# Altium PCB MainBoard_2023_Ver1.PcbDoc (part 1 of 2)
Units mm, origin at the board's own origin, x right, y up, seen from the top; angles counter-clockwise.
Board outline 120.9 x 134.75 mm, 2 copper layers (Top Layer, Bottom Layer); 81 components, 152 nets, 439 pads, 108 vias.
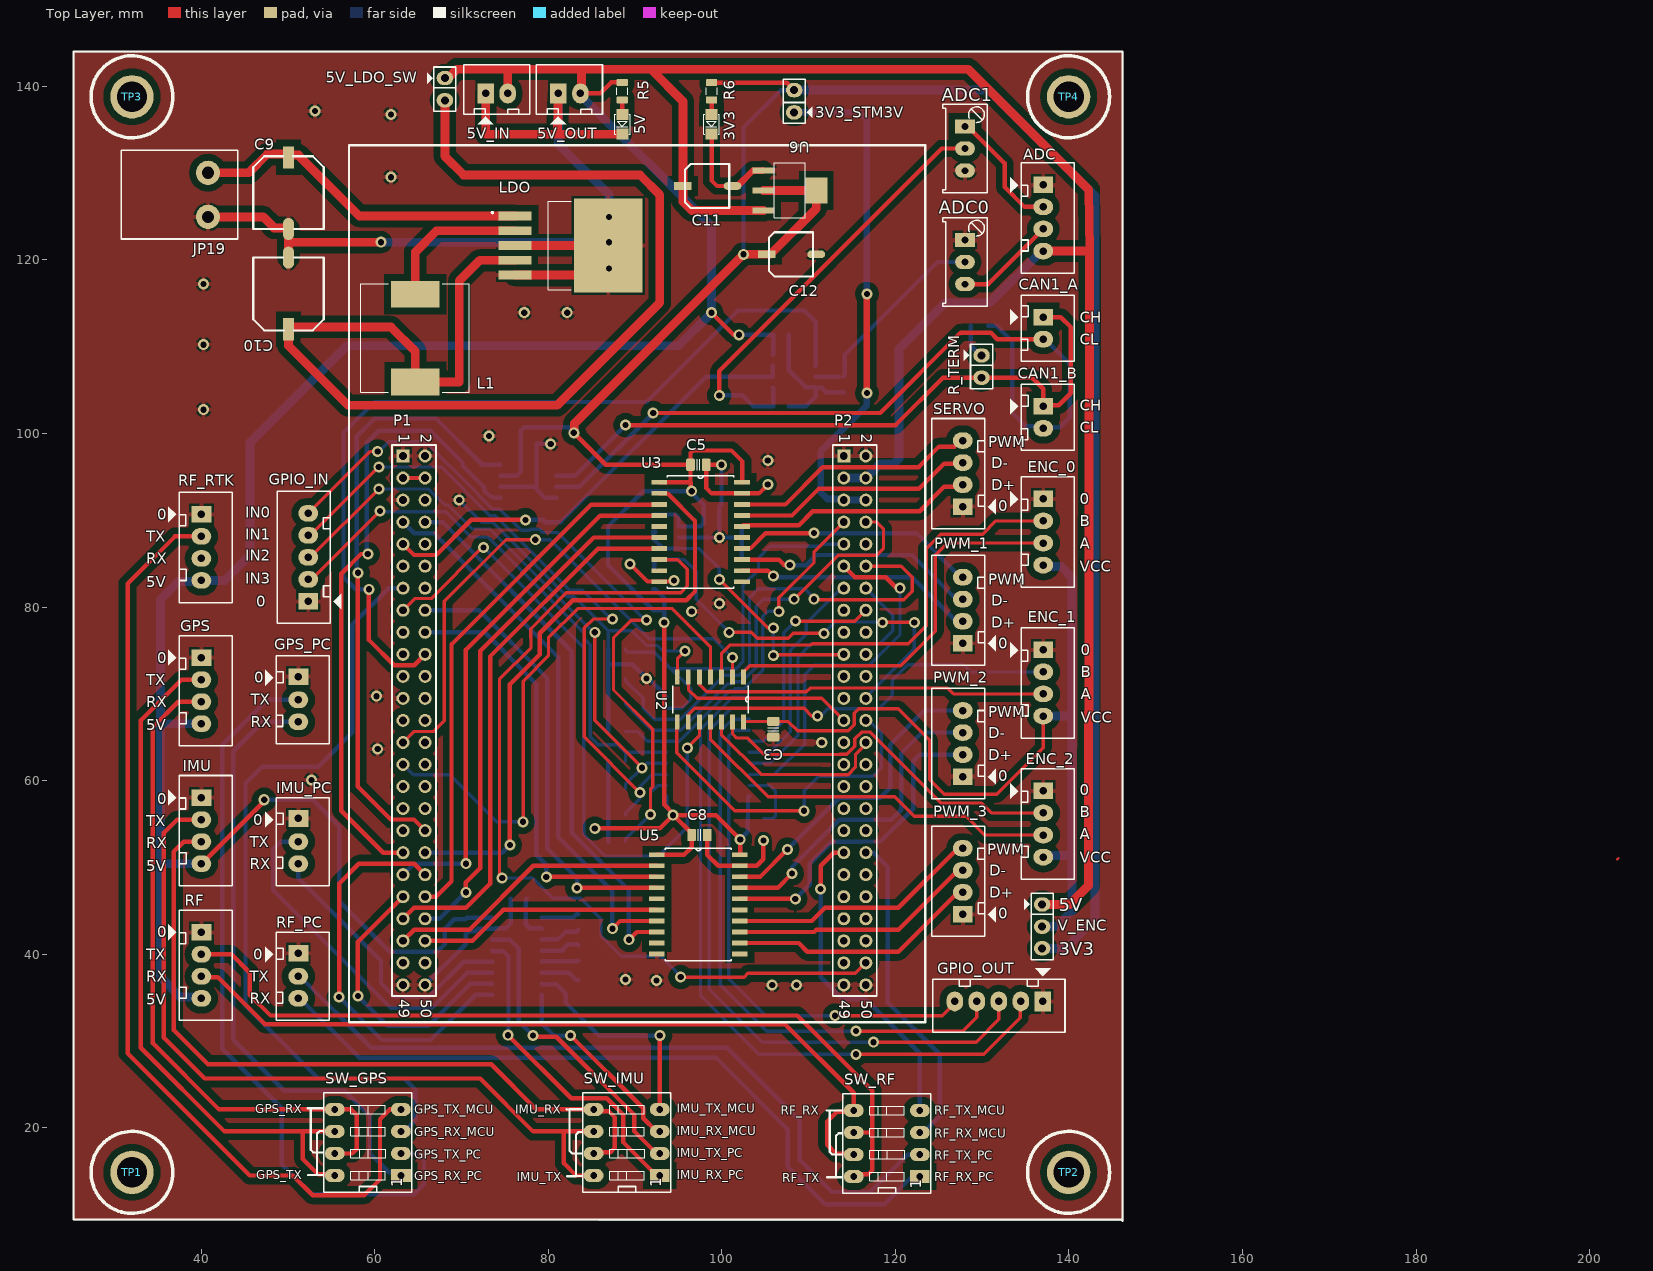
[diagram p0: Top Layer view]
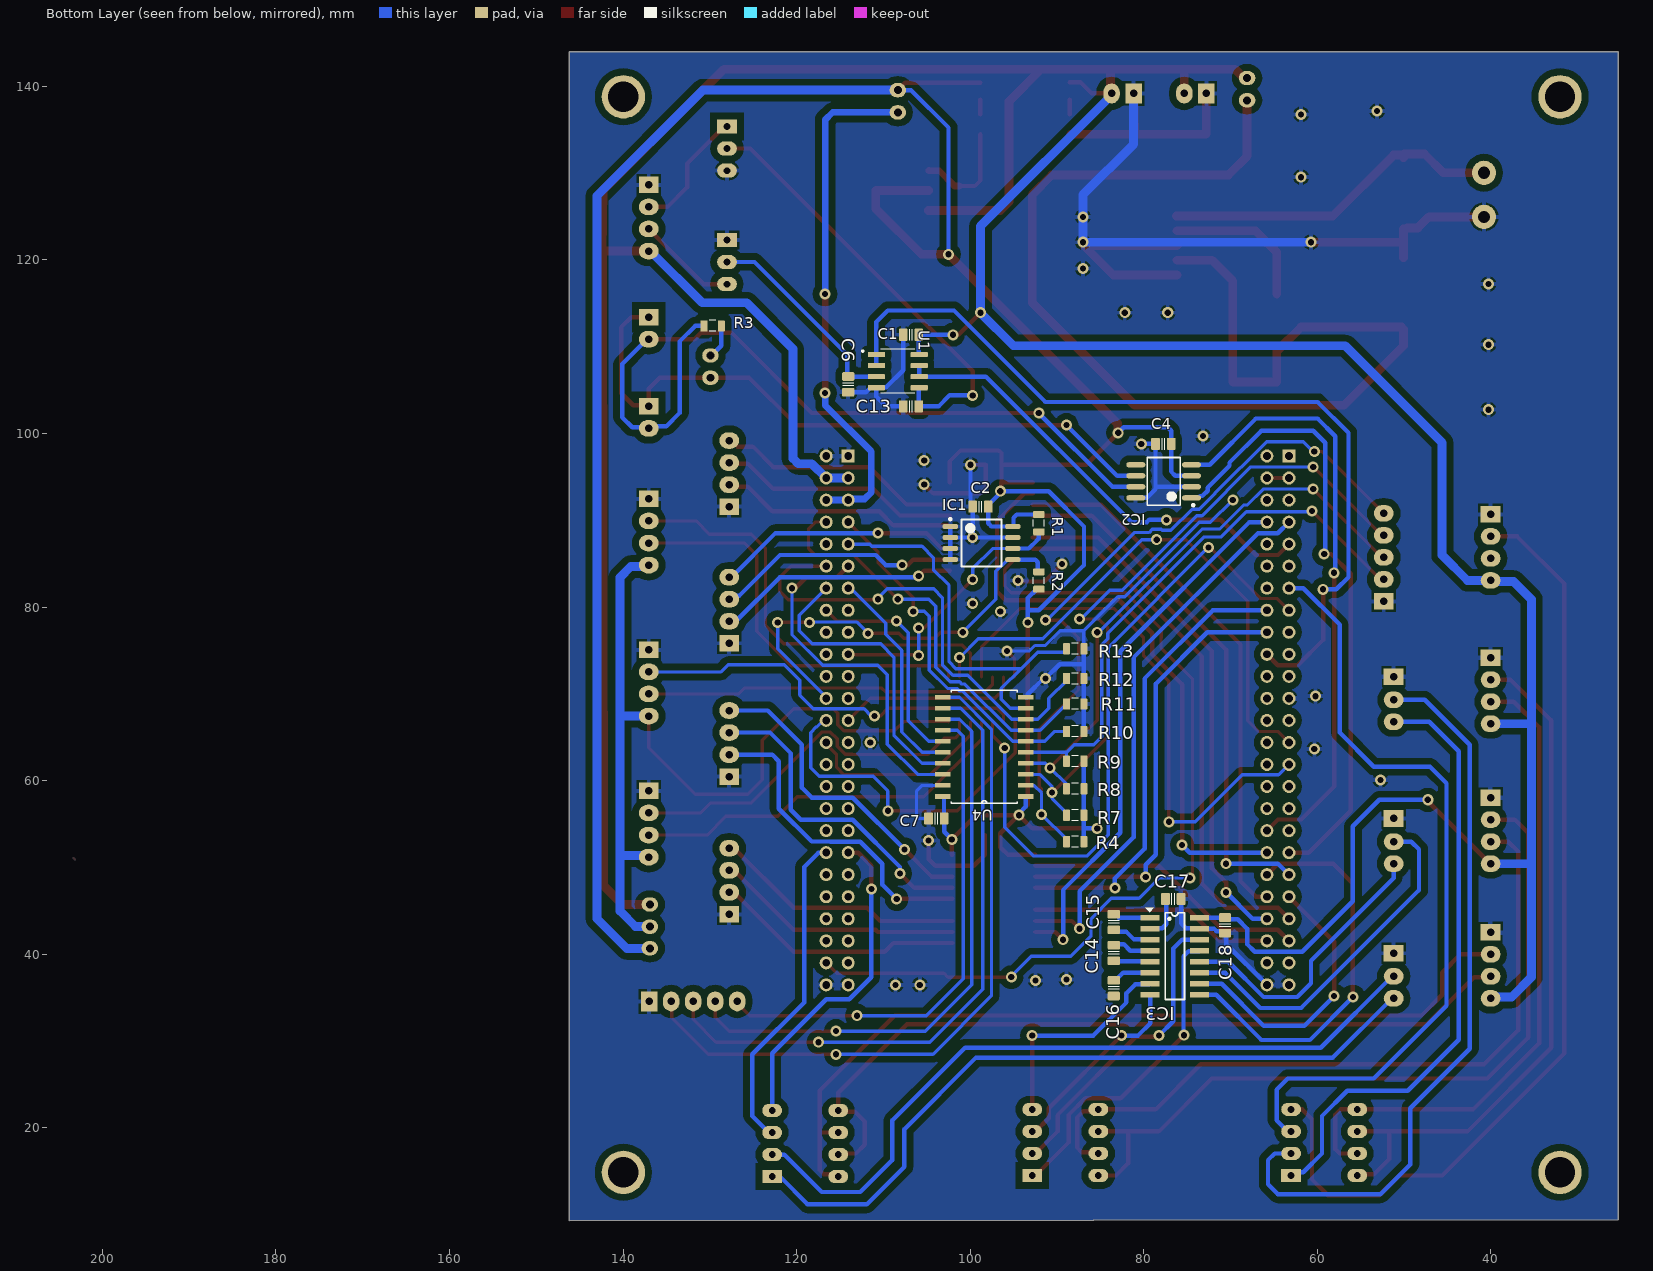
[diagram p1: Bottom Layer view, seen from below]
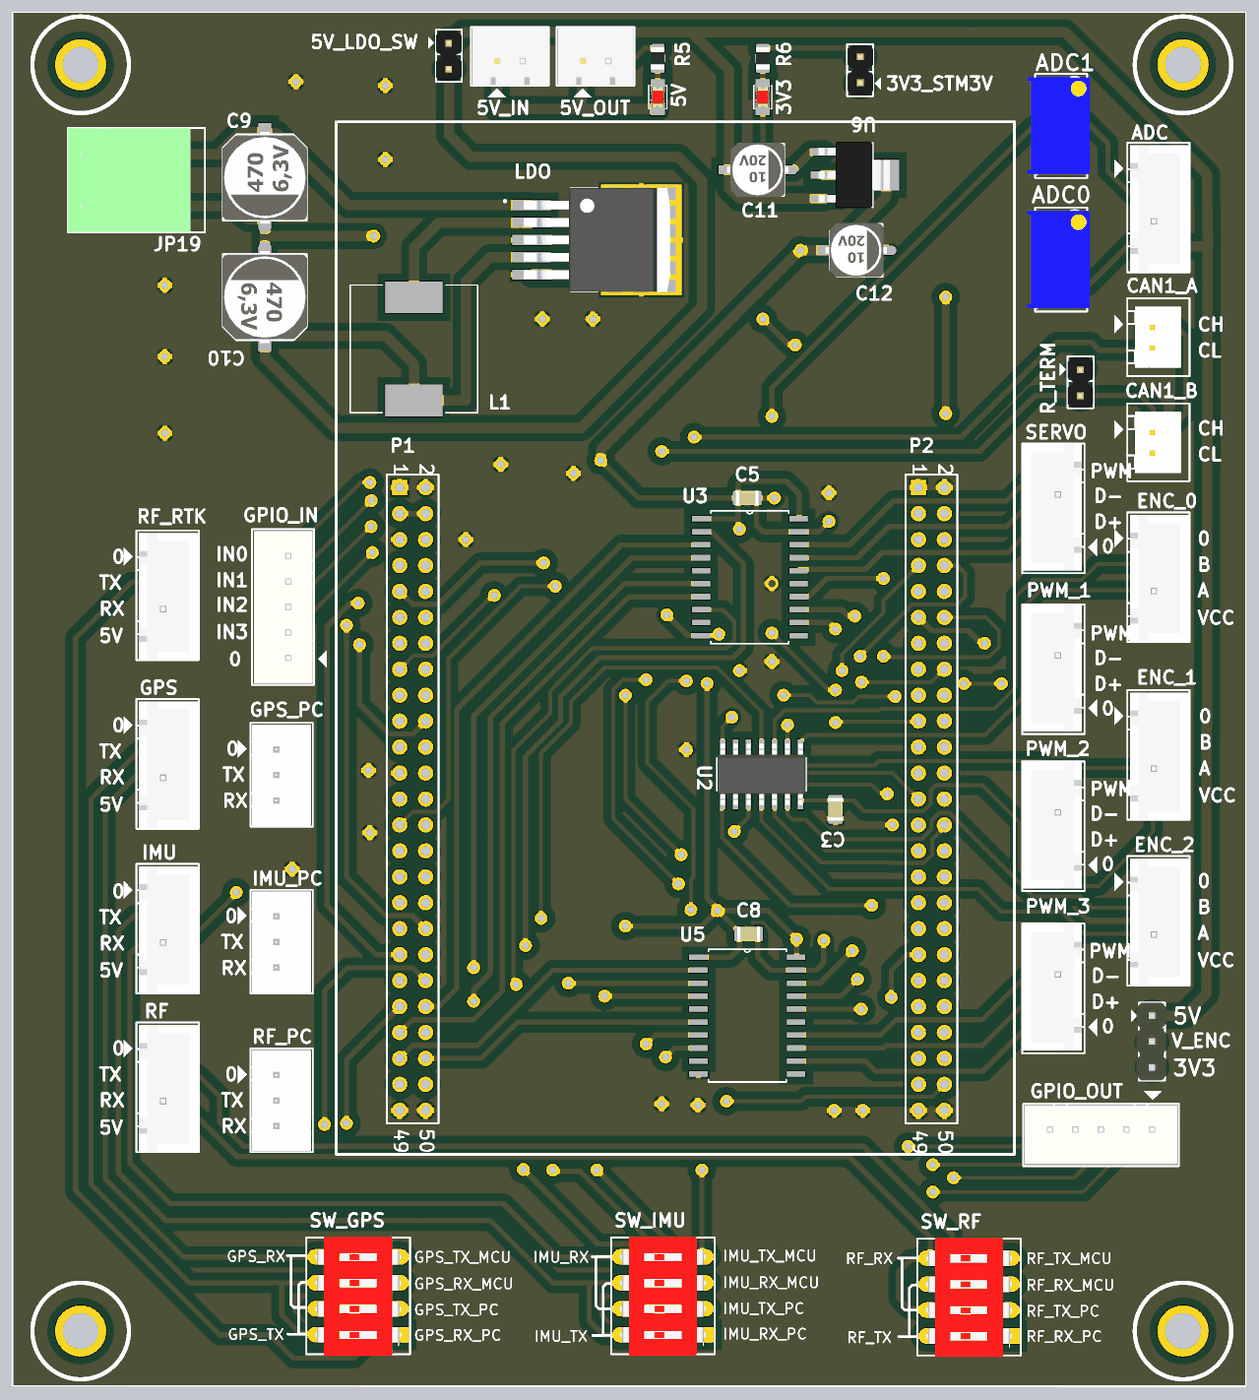
[diagram p3: 3D render of the assembled board from above, using the file's embedded part models]
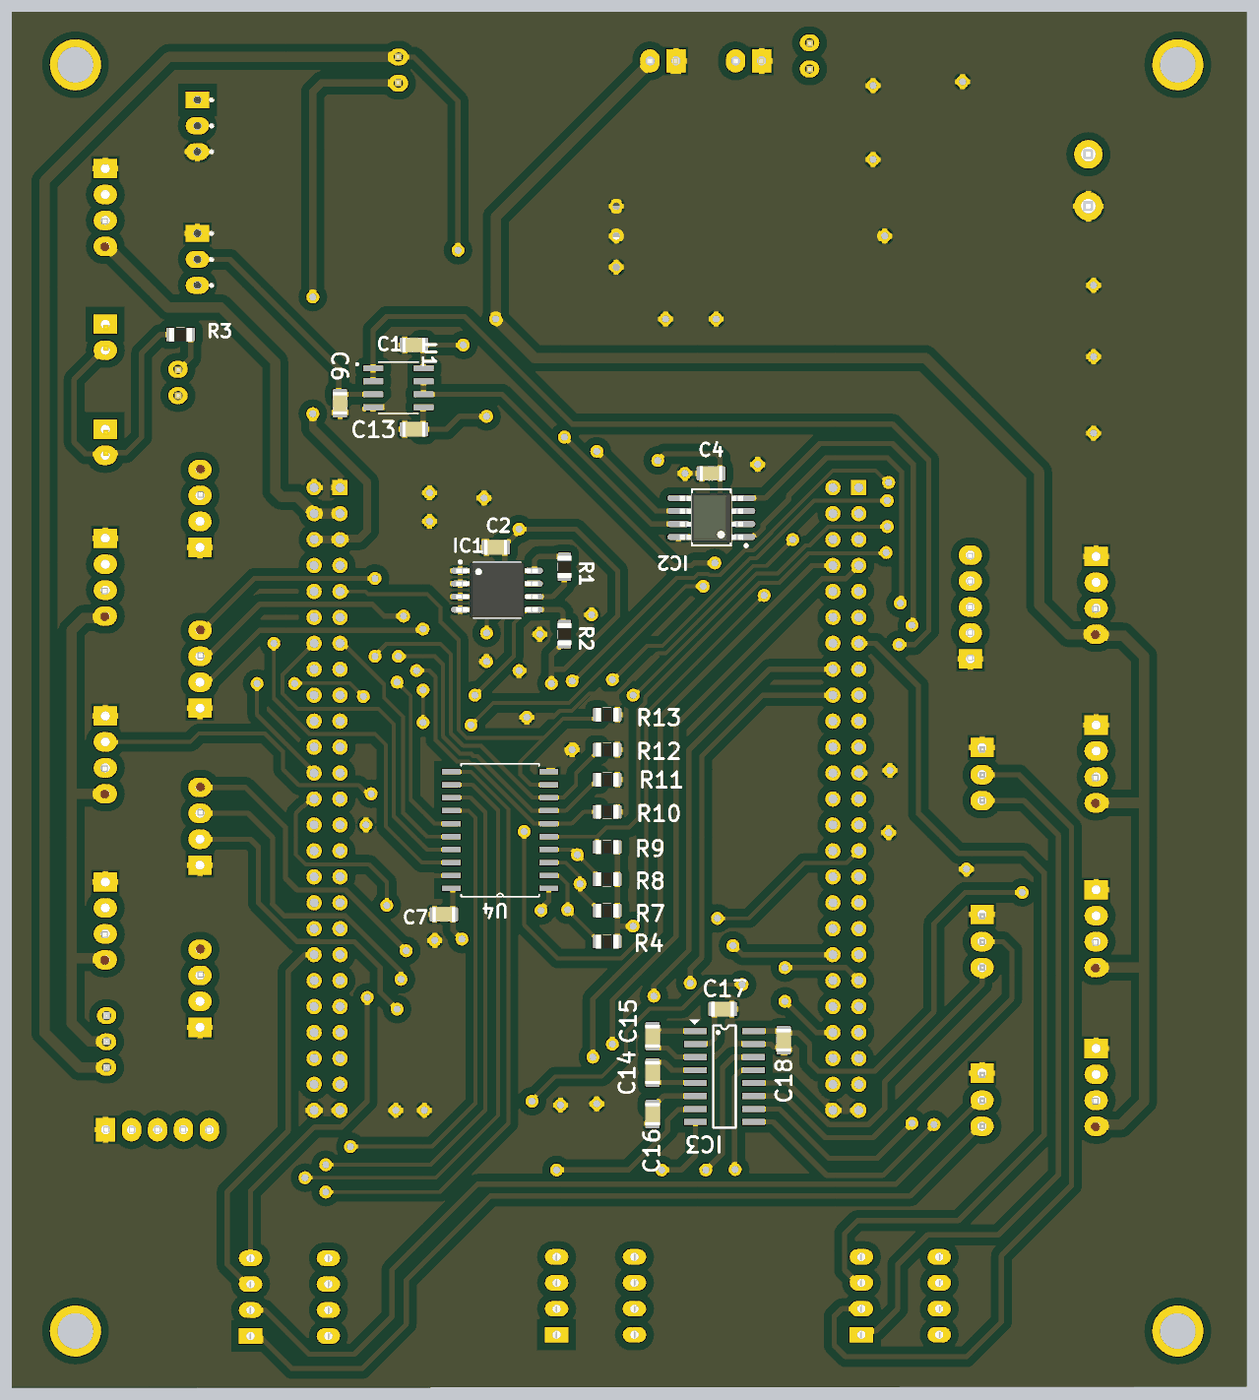
[diagram p4: 3D render of the assembled board from below, using the file's embedded part models]

## Layer stack, top to bottom
Top Solder: solder mask 0.0102, Solder Resist, Dk 3.5
Top Layer: signal copper 0.0356
Dielectric 1: dielectric 0.32, FR-4, Dk 4.8
Bottom Layer: signal copper 0.0356
Bottom Solder: solder mask 0.0102, Solder Resist, Dk 3.5

## Board outline
25.273,76.708 25.273,117.094 25.273,144.018 146.177,144.018 146.177,140.779 146.177,76.39 146.177,9.398 146.177,9.271 25.273,9.398

## Design rules (kind name [scope] priority, off if disabled: settings)
Clearance [All] p1: gap=0.508 ignorepadtopadclearanceinfootprint=FALSE except(0.254: Arc-THPad Track-THPad; 0.381: Arc-Arc Arc-Track Arc-Via Track-Track Track-Via; 0.762: Arc-Fill Arc-Poly Arc-Region Track-Fill Track-Poly Track-Region SMDPad-Fill SMDPad-Poly SMDPad-Region THPad-Fill THPad-Poly THPad-Region Via-Fill Via-Poly Via-Region Fill-Fill Fill-Poly Fill-Region Poly-Poly Poly-Region Region-Region)
PlaneConnect [All] p1: planeconnectstyle=Relief reliefexpansion=0.508 reliefentries=4 reliefconductorwidth=0.508 reliefairgap=0.254
PolygonConnect [All] p1: connectstyle=Relief reliefconductorwidth=0.508 reliefentries=4 polygonreliefangle="90 Angle" airgapwidth=0.254
RoutingVias [All] p1: holewidth=0.711 width=1.27 viastyle="Through Hole" minholewidth=0.711 minwidth=1.27 maxholewidth=0.711 maxwidth=1.27
SolderMaskExpansion [All] p1: expansion=0.102
Width [All] p1: maxlimit=2.54 minlimit=0.254 preferedwidth=0.762 toplayer_prefwidth=0.508 minimp=50.000000 maximp=50.000000 favimp=50.000000
29 further rules are at their usual default settings.

## Components (designator, comment, footprint, x,y, rotation, side; value= is the part's Value field where it differs from the comment)
3V3 "LED SMD" SM-LED-0805-Red 98.806,136.779 r270 top
3V3_STM3V "connector" JP2 108.331,137.008 r90 top
5V "LED SMD" SM-LED-0805-Red 88.519,136.779 r270 top
5V_IN "connector" CON2 72.771,139.192 r0 top
5V_LDO_SW "connector" JP2 68.072,140.97 r270 top
5V_OUT "connector" CON2 81.153,139.192 r0 top
ADC "JP4" CON4 137.033,128.651 r270 top value="Connector 4"
ADC0 "10K" VR1 128.016,122.301 r270 top value="VR 10K"
ADC1 "10K" VR1 128.016,135.382 r270 top value="VR 10K"
C1 "approved sub OK" CAPC2012X135N 106.807,111.379 r180 bottom value=100nF
C2 "approved sub OK" CAPC2012X135N 98.806,91.567 r180 bottom value=100nF
C3 "approved sub OK" CAPC2012X135N 105.918,65.913 r90 top value=100nF
C4 "approved sub OK" CAPC2012X135N 77.724,98.806 r180 bottom value=100nF
C5 "approved sub OK" CAPC2012X135N 97.282,96.393 r180 top value=100nF
C6 "approved sub OK" CAPC2012X135N 114.046,105.664 r270 bottom value=3n3
C7 "approved sub OK" CAPC2012X135N 103.886,55.626 r180 bottom value=100nF
C8 "approved sub OK" CAPC2012X135N 97.409,53.721 r180 top value=100nF
C9 "330uF/35V" "cap_A_SMD 470uF/16V" 45.847,123.571 r0 top
C10 "1000uF/10V" "cap_A_SMD 470uF/16V" 54.229,120.269 r180 top
C11 "10uF/16V" "cap_A_SMD 10uF/16V" 100.457,126.619 r90 top
C12 "10uF/16V" "cap_A_SMD 10uF/16V" 110.109,118.745 r90 top
C13 "approved sub OK" CAPC2012X135N 106.807,103.124 r0 bottom value=3n3
C14 "approved sub OK" CAPC2012X135N 83.439,40.132 r90 bottom value=1uF
C15 "approved sub OK" CAPC2012X135N 83.439,43.688 r90 bottom value=1uF
C16 "approved sub OK" CAPC2012X135N 83.439,36.068 r90 bottom value=1uF
C17 "approved sub OK" CAPC2012X135N 76.581,46.355 r0 bottom value=1uF
C18 "approved sub OK" CAPC2012X135N 70.612,43.307 r90 bottom value=100nF
CAN1_A "JP2" CON2 137.033,113.411 r270 top value="Connector 2"
CAN1_B "JP2" CON2 137.033,103.124 r270 top value="Connector 2"
ENC_0 "Front-Motor" CON4 137.033,92.456 r270 top value="Connector 4"
ENC_1 "Left-Motor" CON4 137.033,75.057 r270 top value="Connector 4"
ENC_2 "Right-Motor" CON4 137.033,58.801 r270 top value="Connector 4"
GPIO_IN "GPIO_IN" CON5 52.324,80.645 r90 top value="Connector 5"
GPIO_OUT "GPIO_OUT" CON5 137,34.544 r180 top value="Connector 5"
GPS "GPS" CON4 40.005,74.168 r270 top value="Connector 4"
GPS_PC "GPS_PC" CON3 51.181,71.844 r270 top value="Connector 3"
IC1 "24C08B/16B_8Lead" SOIC127P800X175-8N 98.679,87.376 r180 bottom value=24Cxx
IC2 "SN65HVD1050D" SO-8N 74.502,96.393 r0 bottom
IC3 "MAX232" SO-G16 76.394,39.751 r270 bottom
IMU "IMU" CON4 40.005,58.039 r270 top value="Connector 4"
IMU_PC "IMU_PC" CON3 51.181,55.499 r270 top value="Connector 3"
JP19 "7-24V INPUT" "MSTB 2/5.08mm" 40.767,124.968 r90 top
L1 "100uH/3A" IND_B82477P4104M000 64.643,110.998 r270 top
LDO "LM2596S-5.0" TO170P1524X483-6N 82.55,121.666 r0 top
P1 "STMF4_1" HDR2X25 63.246,97.409 r270 top locked
P2 "STMF4_2" HDR2X25 114.046,97.409 r270 top locked
PWM_1 "Front-Motor" CON4 127.762,75.819 r90 top value="Connector 4"
PWM_2 "Left-Motor" CON4 127.762,60.452 r90 top value="Connector 4"
PWM_3 "Right-Motor" CON4 127.762,44.577 r90 top value="Connector 4"
R1 "Jumper" RESC2012N_ZERO 92.075,89.662 r270 bottom value=4k7
R2 "Jumper" RESC2012N_ZERO 92.075,83.058 r90 bottom value=4k7
R3 "Jumper" RESC2012N_ZERO 129.667,112.395 r180 bottom value=120R
R4 "10k" RESC2012N_ZERO 87.884,52.959 r180 bottom
R5 "Jumper" RESC2012N_ZERO 88.519,139.446 r270 top value=330R
R6 "Jumper" RESC2012N_ZERO 98.806,139.446 r270 top value=330R
R7 "10k" RESC2012N_ZERO 87.884,56.007 r180 bottom
R8 "10k" RESC2012N_ZERO 87.884,59.055 r180 bottom
R9 "10k" RESC2012N_ZERO 87.884,62.23 r180 bottom
R10 "10k" RESC2012N_ZERO 87.884,65.659 r0 bottom
R11 "10k" RESC2012N_ZERO 87.884,68.834 r0 bottom
R12 "10k" RESC2012N_ZERO 87.884,71.755 r0 bottom
R13 "10k" RESC2012N_ZERO 87.884,75.184 r0 bottom
R_TERM "Jumper 2" JP2 129.921,108.991 r270 top value="JP 2"
RF "RF" CON4 40.005,42.507 r270 top value="Connector 4"
RF_PC "RF_PC" CON3 51.181,39.967 r270 top value="Connector 3"
RF_RTK "RF_RTK" CON4 40.005,90.678 r270 top value="Connector 4"
SERVO "SERVO" CON4 127.762,91.567 r90 top value="Connector 4"
SW_GPS "Select-GPS" DIP8/W0.3K 62.992,14.478 r90 top value="SW - DIP4"
SW_IMU "Select-IMU" DIP8/W0.3K 92.837,14.478 r90 top value="SW - DIP4"
SW_RF "Select-RF" DIP8/W0.3K 122.809,14.351 r90 top value="SW - DIP4"
TP1 "TP" TP6 32.004,14.84 r90 top value="Test Point"
TP2 "TP" TP6 139.954,14.84 r90 top value="Test Point"
TP3 "TP" TP6 32.004,138.811 r90 top value="Test Point"
TP4 "TP" TP6 139.954,138.811 r90 top value="Test Point"
U1 "LM358D" SOIC127P599X175-8N 108.331,107.188 r180 bottom
U2 "74HC14D" SOIC127P600X175-14N 98.679,69.342 r270 top
U3 "74HC245D" SOIC127P1032X265-20N 97.536,88.646 r0 top
U4 "74HC245D" SOIC127P1032X265-20N 98.374,63.881 r0 bottom
U5 "74HC245D" SOIC127P1032X265-20N 97.282,45.72 r0 top
U6 "LM1117-3.3V" LM1117-SOP 106.045,128.016 r270 top
V_ENC "SW" JP3 136.906,43.18 r270 top value=J2-1 (schematic designator ENC_VDD)

## Footprints (in the part's own frame and the unit in brackets; to place one, negate y for a bottom-side part, rotate by r counter-clockwise, add the part's x,y. Pads: shape width x height; smd on the part's side, far side on the other; paste and mask are expansions set on the pad)
"cap_A_SMD 10uF/16V" [mil]
  rect 35x80 smd: 1(75,195)
  oval 35x80 smd: 2(75,-30)
  silkscreen extent -25,-15 175,185, body extent -29,-33 179,203, height 232
"cap_A_SMD 470uF/16V" [mil]
  rect 50x100 smd: 1(165,325)
  oval 50x100 smd: 2(165,0)
  silkscreen extent 5,0 325,330, body extent 2,-12 328,342, height 469
CAPC2012X135N [mm] "Chip Capacitor, Body 2.0x1.2mm, EIA 0805, IPC Medium Density"
  round 0.254 on Mech15: 0(0,0)
  rrect25% 1x1.4 smd: 1(-0.9,0) 2(0.9,0)
  Top Layer pour cut-out: -0.675,0.7 -0.475,0.9 0.475,0.9 0.675,0.7 0.675,-0.7 0.475,-0.9 -0.475,-0.9 -0.675,-0.7
  silkscreen extent -0.15,-0.65 0.15,0.65, body extent -1.1,-0.72 1.1,0.73, height 1.34
CON2 [mil]
  rect 75x90 hole 34: 1(0,0)
  oval 75x90 hole 34: 2(100,0)
  silkscreen extent -100,-140 200,130, body extent -95,-93 196,133, height 281
CON3 [mil] "CON 3 - Header White"
  rect 75x90 hole 34: 1(-5,0)
  oval 75x90 hole 34: 2(100,0) 3(200,0)
  silkscreen extent -100,-150 300,140, body extent -94,-94 296,133, height 276
CON4 [mil]
  rect 75x90 hole 34: 1(0,0)
  oval 75x90 hole 34: 2(100,0) 3(200,0) 4(300,0)
  silkscreen extent -100,-150 400,140, body extent -90,-90 398,136, height 276
CON5 [mil] "CON5"
  rect 75x90 hole 34: 1(0,0)
  oval 75x90 hole 34: 2(100,0) 3(200,0) 4(300,0) 5(400,0)
  silkscreen extent -100,-150 500,140, body extent -93,-94 493,132, height 276
DIP8/W0.3K [mil] "8 PIN, W 400mil , L 450mil, Pin to pin 100mil For Switch"
  rect 60x90 hole 31: 1(0,0)
  oval 60x90 hole 31: 2(100,0) 3(200,0) 4(300,0) 5(300,300) 6(200,300) 7(100,300) 8(0,300)
  silkscreen extent -75,-50 375,350, body extent -80,-45 378,345, height 158
HDR2X25 [mm] "Connector; Header; 25x2 Position"
  rect 1.5x1.5 hole 0.9: 1(0,0)
  round 1.5 hole 0.9: 2(0,2.54) 3(2.54,0) 4(2.54,2.54) 5(5.08,0) 6(5.08,2.54) 7(7.62,0) 8(7.62,2.54) 9(10.16,0) 10(10.16,2.54) 11(12.7,0) 12(12.7,2.54) 13(15.24,0) 14(15.24,2.54) 15(17.78,0) 16(17.78,2.54) 17(20.32,0) 18(20.32,2.54) 19(22.86,0) 20(22.86,2.54) 21(25.4,0) 22(25.4,2.54) 23(27.94,0) 24(27.94,2.54) 25(30.48,0) 26(30.48,2.54) 27(33.02,0) 28(33.02,2.54) 29(35.56,0) 30(35.56,2.54) 31(38.1,0) 32(38.1,2.54) 33(40.64,0) 34(40.64,2.54) 35(43.18,0) 36(43.18,2.54) 37(45.72,0) 38(45.72,2.54) 39(48.26,0) 40(48.26,2.54) 41(50.8,0) 42(50.8,2.54) 43(53.34,0) 44(53.34,2.54) 45(55.88,0) 46(55.88,2.54) 47(58.42,0) 48(58.42,2.54) 49(60.96,0) 50(60.96,2.54)
  silkscreen extent -1.27,-1.27 62.23,3.81, body extent -1.27,-1.27 62.23,3.81, height 1.5
IND_B82477P4104M000 [mm]
  rect 3.1x5.6 smd: 1(-5.05,0) 2(5.05,0)
  silkscreen extent -6.25,-6.25 6.25,6.25
JP2 [mil]
  oval 65x75 hole 36: 1(0,0) 2(101,0)
  silkscreen extent -50,-81 150,50, body extent -48,-50 148,48, height 323
JP3 [mil] "Jumper 3"
  oval 65x75 hole 36: 1(-100,0) 2(1,0) 3(99,0)
  silkscreen extent -150,-81 150,50, body extent -150,-60 150,55, height 355
LM1117-SOP [mm]
  rect 0.7x2.54 smd: 1(-2.3,-1.27) 2(0,-1.27) 3(2.3,-1.27)
  rect 3x2.54 smd: 2(0,4.826)
  silkscreen extent -3.18,0 3.17,3.56, body extent -3.25,-1.78 3.25,5.18, height 1.68
"MSTB 2/5.08mm" [mil]
  round 110 hole 55.12: 1(0,0) 2(200,0)
  silkscreen extent -101,-134 302,394, body extent -100,-79 300,394, height 339
RESC2012N_ZERO [mm] "Chip Resistor, Body 2.0x1.2mm, 0805, IPC Medium Density"
  round 0.254 on Mech15: 0(0,0)
  rrect25% 0.8x1.3 smd: 1(-1,0) 2(1,0)
  Top Layer pour cut-out: -0.725,0.65 -0.525,0.85 0.525,0.85 0.725,0.65 0.725,-0.65 0.525,-0.85 -0.525,-0.85 -0.725,-0.65
  silkscreen extent -0.38,-0.64 0.38,0.64, body extent -1.1,-0.67 1.1,0.68, height 0.69
SM-LED-0805-Red [mil]
  rect 50x55 smd: 1(0,0) 2(90,0)
  silkscreen extent 0,-35 90,35, body extent 5,-25 85,25, height 43
SO-8N [mm] "SOP, 8-Leads, Body 5.3x5.3mm, Pitch 1.27mm, IPC Medium Density"
  oval 2.2x0.6 smd: 1(-0.022,3.81) 2(-0.022,2.54) 3(-0.022,1.27) 4(-0.022,0) 5(6.397,0) 6(6.397,1.27) 7(6.397,2.54) 8(6.397,3.81)
  silkscreen extent -0.35,-0.84 5.08,4.78, body extent 0.08,-0.48 6.27,4.34, height 1.7
SO-G16 [mm] "Small Outline; 16 Leads; Body Width 3.9 mm; Pitch 1.27 mm"
  rect 0.6x2.2 smd: 1(-4.445,-2.854) 2(-3.175,-2.854) 3(-1.905,-2.854) 4(-0.635,-2.854) 5(0.635,-2.854) 6(1.905,-2.854) 7(3.175,-2.854) 8(4.445,-2.854) 9(4.445,2.854) 10(3.175,2.854) 11(1.905,2.854) 12(0.635,2.854) 13(-0.635,2.854) 14(-1.905,2.854) 15(-3.175,2.854) 16(-4.445,2.854)
  silkscreen extent -5.59,-3.43 5,1.1
SOIC127P599X175-8N [mm]
  rrect25% 1.97x0.6 smd: 1(-2.47,1.905) 2(-2.47,0.635) 3(-2.47,-0.635) 4(-2.47,-1.905) 5(2.47,-1.905) 6(2.47,-0.635) 7(2.47,0.635) 8(2.47,1.905)
  silkscreen extent -4.14,-2.52 1.95,2.52
SOIC127P600X175-14N [mil]
  rect 67x21 smd: 1(-102,150) 2(-102,100) 3(-102,50) 4(-102,0) 5(-102,-50) 6(-102,-100) 7(-102,-150) 8(102,-150) 9(102,-100) 10(102,-50) 11(102,0) 12(102,50) 13(102,100) 14(102,150)
  silkscreen extent -63,-172 63,172, body extent -118,-170 118,170, height 69
SOIC127P800X175-8N [mm] "SOIC, 8-Leads, Body 5.24x5.29mm, Pitch 1.27mm, IPC Medium Density"
  oval 1.8x0.6 smd: 1(-3.6,1.905) 2(-3.6,0.635) 3(-3.6,-0.635) 4(-3.6,-1.905) 5(3.6,-1.905) 6(3.6,-0.635) 7(3.6,0.635) 8(3.6,1.905)
  silkscreen extent -3.73,-2.7 2.3,2.88, body extent -3.99,-2.7 3.99,2.7, height 1.75
SOIC127P1032X265-20N [mil]
  rect 71x21 smd: 1(-188,225) 2(-188,175) 3(-188,125) 4(-188,75) 5(-188,25) 6(-188,-25) 7(-188,-75) 8(-188,-125) 9(-188,-175) 10(-188,-225) 11(188,-225) 12(188,-175) 13(188,-125) 14(188,-75) 15(188,-25) 16(188,25) 17(188,75) 18(188,125) 19(188,175) 20(188,225)
  silkscreen extent -150,-256 150,256
TO170P1524X483-6N [mm]
  rect 3.79x0.99 smd: 1(-6.4,3.4) 2(-6.4,1.7) 3(-6.4,0) 4(-6.4,-1.7) 5(-6.4,-3.4)
  rect 7.88x10.84 smd paste-6: 6(4.35,0)
  silkscreen extent -9.1,-5.08 0.09,5.08, body extent -7.18,-5.08 7.18,5.08, height 4.65
TP6 [mm] "Jac cap 6ly"
  round 5 hole 3.5: 1(0,0)
  silkscreen extent -4.72,-4.72 4.72,4.72
VR1 [mil] "Variable Resistor"
  rect 65x90 hole 30: 1(0,0)
  oval 65x90 hole 30: 2(100,0) 3(200,0)
  silkscreen extent -100,-100 301,100, body extent -88,-130 288,110, height 455

## Part data
3V3 5V: library part "LED SMD 0805"
3V3_STM3V 5V_IN 5V_LDO_SW 5V_OUT JP19: library part Con2, "connector 2"
ADC ENC_0 ENC_1 ENC_2 GPS IMU PWM_1 PWM_2 PWM_3 RF RF_RTK SERVO: library part Con4, "Connector 4"
ADC0 ADC1: library part VR, "Var Resistor"
C1 C2 C3 C4 C5 C6 C7 C8 C13 C14 C15 C16 C17 C18: library part "CAP C_0805", "Capacitor SMD Cer 1.8nF 10% 50V X7R 0805", Manufacturer 1="AVX Corporation", Manufacturer Part Number 1=08055C182KAT2A, Operating Temperature="-55°C ~ 125°C", Package / Case="0805 (2012 metric)", Ratings="50V; X7R", Supplier Part Number 1=478-1374-1-ND, Tolerance=±10%, SCDType=source*, Supplier 1=Digi-Key
C9 C10 C11 C12: library part "CAP hoa", "Cap"
CAN1_A CAN1_B: library part Con2, "Connector 2"
GPIO_IN GPIO_OUT: library part Con5, "Connector 5"
GPS_PC IMU_PC RF_PC: library part Con3, "Connector 3"
IC1: "Standard 2-Wire Bus Interface Serial EEPROM", Copyright by=VanDungEvn
IC2: "CAN DRIVER"
IC3: "Dual EIA-232 Driver/Receiver"
L1: library part B82477P4104M000, Package=None, Availability="In Stock", Check_prices=https://www.snapeda.com/parts/B82477P4104M000/TM+Electronics/view-part/?ref=eda, MF="TDK ELECTRONICS", MP=B82477P4104M000, Price=None, Purchase-URL=https://pricing.snapeda.com/search/part/B82477P4104M000/?ref=eda, SnapEDA_Link=https://www.snapeda.com/parts/B82477P4104M000/TM+Electronics/view-part/?ref=snap
LDO: "SIMPLE SWITCHER&reg; 4.5V to 40V, 3A Low Component Count Step-Down Regulator", Package="TO-263-5 Texas Instruments", Availability="In Stock", Check_prices=https://www.snapeda.com/parts/LM2596S-5.0/NOPB/Texas+Instruments/view-part/?ref=eda, MF="Texas Instruments", MP=LM2596S-5.0/NOPB, Price=None, Purchase-URL=https://pricing.snapeda.com/search/part/LM2596S-5.0/NOPB/?ref=eda, SnapEDA_Link=https://www.snapeda.com/parts/LM2596S-5.0/NOPB/Texas+Instruments/view-part/?ref=snap
P1 P2: library part "Header 25X2", "Header, 25-Pin, Dual row", LatestRevisionDate=17-Jul-2002, LatestRevisionNote="Re-released for DXP Platform.", Publisher="Altium Limited"
R1 R2 R3 R5 R6: library part RES_0805, "Resistor SMD chip 0.0 Ohm 0.125W 0805", Manufacturer 1="Samsung Electro-Mechanics America, Inc", Manufacturer 2="Stackpole Electronics Inc", Manufacturer 3=Yageo, Manufacturer 4="Panasonic Electronic Components", Manufacturer 5="Rohm Semiconductor", Manufacturer Part Number 1=RC2012J000CS, Manufacturer Part Number 2=RMCF0805ZT0R00, Manufacturer Part Number 3=RC0805JR-070RL, Manufacturer Part Number 4=ERJ-6GEY0R00V, Manufacturer Part Number 5=MCR10ERTJ000, Package / Case="0805 (2012 metric)", Ratings=1/8W, Supplier Part Number 1=1276-5466-6-ND, Tolerance=N/A, ComponentLink1Description=http://www.samsungsem.com/servlet/FileDownload?filename=productcatalog/pdf/Chip_Resistor.pdf, ComponentLink1URL=http://www.samsungsem.com/servlet/FileDownload?filename=productcatalog/pdf/Chip_Resistor.pdf, ComponentLink2Description=http://www.seielect.com/Catalog/SEI-RMCF_RMCP.pdf, ComponentLink2URL=http://www.seielect.com/Catalog/SEI-RMCF_RMCP.pdf, ComponentLink3Description=http://media.digikey.com/pdf/Data%20Sheets/Yageo%20PDFs/RC0805%20Pb%20Free.pdf, ComponentLink3URL=http://media.digikey.com/pdf/Data%20Sheets/Yageo%20PDFs/RC0805%20Pb%20Free.pdf, ComponentLink4Description=http://industrial.panasonic.com/www-cgi/jvcr13pz.cgi?E+PZ+3+AOA0001+ERJ6GEY0R00V+7+WW, ComponentLink4URL=http://industrial.panasonic.com/www-cgi/jvcr13pz.cgi?E+PZ+3+AOA0001+ERJ6GEY0R00V+7+WW, ComponentLink5Description=http://rohmfs.rohm.com/en/products/databook/datasheet/passive/resistor/chip_resistor/mcr_g.pdf, ComponentLink5URL=http://rohmfs.rohm.com/en/products/databook/datasheet/passive/resistor/chip_resistor/mcr_g.pdf, RoHS 1="RoHS Compliant", RoHS 2="RoHS Compliant", RoHS 3="RoHS Compliant", RoHS 4="RoHS Compliant", RoHS 5="RoHS Compliant", SCDType=spec, Supplier 1=Digi-Key, Supplier 2=Digi-Key, Supplier 3=Digi-Key, Supplier 4=Digi-Key, Supplier 5=Digi-Key, Supplier Part Number 2=RMCF0805ZT0R00DKR-ND, Supplier Part Number 3=311-0.0ARDKR-ND, Supplier Part Number 4=P0.0ADKR-ND, Supplier Part Number 5=RHM0.0CPDKR-ND
R4 R7 R8 R9 R10 R11 R12 R13: library part Res, "Res"
R_TERM: library part "JP 2"
SW_GPS SW_IMU SW_RF: library part SWDIP-4, "DIP Switch, 4 Position, SPST"
TP1 TP2 TP3 TP4: library part TP1, "Test Point"
U1: "Dual standard operational amplifier 8-SOIC 0 to 70", Package="SOIC-8 Texas Instruments", Arrow_Asia-Purchase-URL=https://snapeda.com/shop?store=Arrow+Asia&id=4793021, Arrow_Electronics-Purchase-URL=https://snapeda.com/shop?store=Arrow+Electronics&id=4793021, Check_prices=https://www.snapeda.com/parts/LM358D/Texas%20Instruments/view-part/4793021/?ref=eda, Digi-Key_Part_Number=296-1014-2-ND, DigiKey-Purchase-URL=https://snapeda.com/shop?store=DigiKey&id=4793021, MF="Texas Instruments", Mouser-Purchase-URL=https://snapeda.com/shop?store=Mouser&id=4793021, MP=LM358D, SnapEDA_Link=https://www.snapeda.com/parts/LM358D/Texas%20Instruments/view-part/4793021/?ref=snap, Texas_Instruments-Purchase-URL=https://snapeda.com/shop?store=Texas+Instruments&id=4793021
U2: "Inverter IC 6 Channel Schmitt Trigger 14-SOIC", Package="SO14-14 Nexperia USA Inc.", Availability="In Stock", Check_prices=https://www.snapeda.com/parts/74HC14D/Toshiba+Semiconductor+and+Storage/view-part/?ref=eda, MF=Toshiba, MP=74HC14D, Price=None, Purchase-URL=https://pricing.snapeda.com/search/part/74HC14D/?ref=eda, SnapEDA_Link=https://www.snapeda.com/parts/74HC14D/Toshiba+Semiconductor+and+Storage/view-part/?ref=snap
U3 U4 U5: "Transceiver, Non-Inverting 1 Element 8 Bit per Element 3-State Output 20-SOIC", Package="SOIC-20 Toshiba Semiconductor", Availability="In Stock", Check_prices=https://www.snapeda.com/parts/74HC245D/Toshiba+Semiconductor+and+Storage/view-part/?ref=eda, MF=Toshiba, MP=74HC245D, Price=None, Purchase-URL=https://pricing.snapeda.com/search/part/74HC245D/?ref=eda, SnapEDA_Link=https://www.snapeda.com/parts/74HC245D/Toshiba+Semiconductor+and+Storage/view-part/?ref=snap
U6: library part LM1117, "800mA Low-Dropout Linear Regulator", Creator="Nguyen Ba Bien", Website=http://group3i.net
V_ENC: library part "JP 2-1", "Jumper 2-1"

## Via types
v1: diameter 1.27, hole 0.711, Top Layer to Bottom Layer, 108 vias

## Nets (pads, with @x,y where several pads share a name; then routed paths per layer and width w, separated by ;. In a path a pad name is that pad's centre, name@x,y a point inside that pad or via, vN(x,y) a via of type N, cw(c..) or ccw(c..) an arc to the next point about the centre after c; other vN are vias at no path point)
3V3: 3V3_STM3V.2 C2.2 C4.2 C5.2 C7.2 C8.2 C12.1 IC1.8 IC2.3 R1.1 R2.1 R4.2 R6.1 R7.2 R8.2 R9.2 U3.1 U3.20 U4.1 U4.20 U5.1 U5.20 U6.2 V_ENC.3 | length 366.9
  Top Layer w0.508: v1(82.931,100.076) 86.614,96.393 C5.2@96.382,96.393 ; v1(85.344,54.483) 92.837,54.483 v1(94.361,56.007) ; U5.1@92.507,51.435 95.631,51.435 96.509,52.313 C8.2@96.509,53.721 96.509,53.921 v1@94.423,56.007 ; U3.1@92.761,94.361 96.382,94.361 C5.2@96.382,96.393 ; v1(93.345,78.232) 93.345,57.229 94.361,56.213 v1(94.361,56.007) ; 96.387,94.361 96.387,93.478 v1(96.52,93.345) ; R6.1@98.806,140.446 107.458,140.446 3V3_STM3V.2@108.331,139.573 ; U5.20@102.057,51.435 102.095,51.435 102.108,51.448 v1(102.108,53.213) 99.314,56.007 v1@94.423,56.007 ; U3.20@102.311,94.361 102.349,94.361 102.362,94.374 102.362,96.774 101.092,98.044 96.68,98.044 96.382,97.746 C5.2@96.382,96.393 ; v1(94.361,56.007) v1@94.423,56.007
  Top Layer w1.016: v1(82.931,100.076) 82.98,100.125 82.98,101.141 v1(102.489,120.65) C12.1@105.156,120.65 105.6,120.65 110.871,125.92 U6.2@110.871,128.016 U6.2@104.775,128.016
  Bottom Layer w0.508: IC2.3@74.48,95.123 74.495,95.138 76.342,95.138 76.835,95.631 76.835,98.795 C4.2@76.824,98.806 76.824,100.319 77.216,100.711 82.296,100.711 v1(82.931,100.076) ; v1(85.344,54.483) 86.884,54.483 ; R4.2@86.884,52.959 86.884,54.483 ; R9.2@86.884,62.23 R8.2@86.884,59.055 R7.2@86.884,56.007 86.884,54.483 ; R1.1@92.075,90.662 94.631,90.662 94.996,90.297 94.996,89.323 95.038,89.281 IC1.8@95.079,89.281 97.536,89.281 97.906,89.651 C2.2@97.906,91.567 97.906,91.767 96.52,93.153 v1(96.52,93.345) 90.932,93.345 86.868,89.281 86.868,84.836 92.075,79.629 93.345,79.629 ; R2.1@92.138,81.994 R2.1@92.075,82.058 92.325,82.058 93.345,81.038 93.345,79.629 ; v1(93.345,78.232) 93.345,79.629 ; U4.1@93.599,58.166 93.599,56.975 94.361,56.213 v1(94.361,56.007) ; v1(102.108,53.213) 102.986,54.091 C7.2@102.986,55.626 ; v1(102.489,120.65) 102.489,135.255 106.807,139.573 3V3_STM3V.2@108.331,139.573 ; C7.2@103.008,55.88 103.008,58.153 103.021,58.166 U4.20@103.149,58.166
  Bottom Layer w1.016: 3V3_STM3V.2@108.331,139.573 130.81,139.573 143.002,127.381 143.002,45.339 143.002,44.069 139.573,40.64 V_ENC.3@136.906,40.64
5V: 5V_IN.2 5V_LDO_SW.1 5V_OUT.2 ADC.4 C1.2 C11.1 C18.2 GPS.4 IC3.16 IMU.4 P2.3 P2.4 R5.1 RF.4 RF_RTK.4 U1.8 U6.3 V_ENC.1 | length 488.3
  Top Layer w0.508: IMU.4@40.005,50.419 40.037,50.419 47.244,57.626 v1(47.244,57.785) ; 5V_OUT.2@83.693,139.192 85.979,139.192 87.249,140.462 R5.1@88.503,140.462 ; v1(98.806,113.919) 101.346,111.379 v1(101.981,111.379)
  Top Layer w1.016: 5V_LDO_SW.1@68.072,140.97 68.44,140.97 69.456,141.986 75.311,141.986 ; 5V_IN.2@75.311,139.192 75.311,141.986 ; U6.3@104.775,125.716 96.534,125.716 95.504,126.746 C11.1@95.504,128.524 95.504,138.303 91.821,141.986 ; V_ENC.1@136.906,45.72 140.081,45.72 142.24,47.879 142.24,50.379 142.367,121.031 ADC.4@137.033,121.031 ; 142.394,121.051 142.287,128.096 128.397,141.986 91.821,141.986 ; 75.311,141.986 83.82,141.986 ; 5V_OUT.2@83.82,139.51 83.82,141.986 ; 5V_OUT.2@83.82,139.51 83.82,139.319 5V_OUT.2@83.693,139.192 83.693,139.382 5V_OUT.2@83.82,139.51 ; 83.82,141.986 91.821,141.986
  Bottom Layer w0.508: v1(47.244,57.785) 52.832,57.785 55.88,54.737 55.88,46.101 61.71,40.271 67.195,40.271 68.072,41.148 68.072,42.926 69.15,44.004 70.409,44.004 C18.2@70.612,44.207 70.617,44.202 73.535,44.202 IC3.16@73.54,44.196 ; v1(101.981,111.379) C1.2@105.907,111.379 105.907,109.139 U1.8@105.861,109.093
  Bottom Layer w1.016: RF.4@40.005,34.887 39.835,35.057 37.587,35.057 35.306,37.338 35.306,50.419 ; IMU.4@40.005,50.419 35.306,50.419 ; GPS.4@40.005,66.548 35.306,66.548 ; 5V_OUT.2@83.693,139.192 83.693,139.001 98.806,123.888 v1(98.806,113.919) 94.996,110.109 56.769,110.109 45.593,98.933 45.593,85.979 42.672,83.058 RF_RTK.4@40.005,83.058 39.878,82.931 37.338,82.931 35.306,80.899 35.306,66.548 ; P2.3@114.046,94.869 P2.4@116.586,94.869 118.237,96.52 119.801,96.52 120.396,97.115 120.396,109.728 125.73,115.062 130.874,115.062 136.843,121.031 ADC.4@137.033,121.031 ; 35.306,50.419 35.306,66.548
5V_OUT: L1.1 LDO.2 | length 17.4
  Top Layer w1.016: L1.1@64.643,116.048 64.643,120.904 67.105,123.366 LDO.2@76.15,123.366
5V_R: 5V_LDO_SW.2 C10.1 L1.2 LDO.4 | length 141.5
  Top Layer w1.016: 5V_LDO_SW.2@68.072,138.405 68.072,131.953 70.231,129.794 90.551,129.794 92.837,127.508 92.837,115.062 81.026,103.251 56.896,103.251 50.038,110.109 C10.1@50.038,112.014 50.292,112.268 61.849,112.268 64.643,109.474 L1.2@64.643,105.948 69.723,105.948 69.723,117.602 72.087,119.966 LDO.4@76.15,119.966
ADC0: ADC0.3 ADC.3 | length 11.6
  Top Layer w0.508: ADC0.3@128.016,117.221 130.683,117.221 ADC.3@137.033,123.571
ADC1: ADC1.1 ADC.2 | length 14.5
  Top Layer w0.508: ADC1.1@128.016,135.382 128.333,135.382 132.588,131.127 132.588,128.397 134.874,126.111 ADC.2@137.033,126.111
ADC1_IN14: P1.20 U1.1 U1.2 | length 100
  Top Layer w0.508: v1(59.309,82.042) 59.309,76.2 62.218,73.291 64.528,73.291 P1.20@65.786,74.549
  Bottom Layer w0.508: v1(59.309,82.042) 57.785,82.042 56.388,83.439 56.388,100.076 59.944,103.632 91.313,103.632 101.854,114.173 109.474,114.173 110.801,112.846 U1.1@110.801,109.093 U1.2@110.801,107.823
ADC2_IN13: P1.9 U1.6 U1.7 | length 53.1
  Top Layer w0.508: P1.9@63.246,87.249 64.504,85.991 67.068,85.991 71.12,90.043 v1(77.343,90.043)
  Bottom Layer w0.508: v1(77.343,90.043) 79.351,90.043 79.605,89.789 81.407,89.789 98.171,106.553 U1.6@105.861,106.553 U1.7@105.861,107.823
BOOT0: P2.21
CAN1_RX: P2.36
CAN1_TX: P2.33
CAN2_RX: IC2.4 P1.36 | length 69.9
  Top Layer w0.508: v1(58.039,83.947) 58.039,59.309 61.837,55.511 64.504,55.511 P1.36@65.786,54.229
  Bottom Layer w0.508: v1(58.039,83.947) 57.912,84.074 57.912,99.695 59.944,101.727 67.056,101.727 72.39,96.393 IC2.4@74.48,96.393
CAN2_TX: IC2.1 P1.37 | length 72.9
  Top Layer w0.508: v1(59.182,86.106) 58.402,86.106 56.134,83.838 56.134,56.515 60.96,51.689 P1.37@63.246,51.689
  Bottom Layer w0.508: v1(59.182,86.106) 59.055,86.233 59.055,98.933 60.452,100.33 66.421,100.33 70.104,96.647 70.104,96.28 72.618,93.766 72.618,93.413 73.24,92.791 73.447,92.791 73.655,92.583 IC2.1@74.48,92.583
EEP_SCL: IC1.6 P2.19 R1.2 | length 31.4
  Top Layer w0.381: v1(99.695,83.185) 105.283,77.597 v1(105.918,77.597) ; v1(105.918,74.422) 105.981,74.486 113.983,74.486 P2.19@114.046,74.549
  Bottom Layer w0.381: IC1.6@95.079,86.741 97.409,86.741 99.695,84.455 99.695,83.439 v1@99.441,83.185 ; v1(105.918,74.422) v1(105.918,77.597)
  Bottom Layer w0.508: R1.2@92.075,88.662 92.313,88.662 92.075,88.424 92.075,87.884 92.757,87.202 92.778,87.202 93.239,86.741 IC1.6@95.079,86.741
EEP_SDA: IC1.5 P2.24 R2.2 | length 48.6
  Top Layer w0.381: v1(100.838,77.089) 103.399,77.089 104.097,76.391 107.643,76.391 108.214,76.962 v1(111.76,76.962) ; v1(118.491,78.232) v1(122.174,78.232)
  Bottom Layer w0.381: IC1.5@95.079,85.471 95.679,85.471 97.028,84.122 97.028,80.899 v1(100.838,77.089) ; v1(111.76,76.962) 113.082,78.284 118.312,78.284 118.364,78.232 v1(118.491,78.232) ; P2.24@116.586,69.469 116.586,69.586 122.174,75.174 v1(122.174,78.232)
  Bottom Layer w0.508: R2.2@92.202,84.185 92.202,85.173 92.5,85.471 IC1.5@95.079,85.471
ENC_A0: P1.27 U2.2 | length 63.6
  Top Layer w0.381: P1.27@63.246,64.389 64.516,65.659 66.802,65.659 68.008,66.865 68.008,80.653 75.112,87.757 v1(78.486,87.757) ; U2.2@101.219,71.933 v1(101.219,74.168)
  Bottom Layer w0.381: v1(78.486,87.757) 80.209,87.757 91.639,76.327 99.06,76.327 v1(101.219,74.168)
ENC_A1: P2.25 U2.6 | length 20.8
  Top Layer w0.381: U2.6@96.139,71.933 96.139,70.485 97.155,69.469 111.506,69.469 P2.25@114.046,66.929
ENC_A2: P1.15 U2.10 | length 77.2
  Top Layer w0.381: P1.15@63.246,79.629 64.591,80.974 66.496,80.974 72.39,86.868 v1(72.517,86.868) ; v1(96.012,63.754) 97.409,65.151 U2.10@97.409,66.751
  Bottom Layer w0.381: v1(72.517,86.868) 72.531,86.868 84.074,75.325 84.074,53.745 86.511,51.308 92.71,51.308 96.012,54.61 v1(96.012,63.754)
ENC_B0: P1.29 U2.4 | length 64.4
  Top Layer w0.381: v1(77.089,55.245) 77.089,71.459 80.01,74.38 80.01,76.454 83.376,79.819 94.297,79.819 98.679,75.438 U2.4@98.679,71.933
  Bottom Layer w0.381: P1.29@63.246,61.849 64.441,60.654 68.632,60.654 74.041,55.245 v1(77.089,55.245)
ENC_B1: P2.26 U2.8 | length 39.7
  Top Layer w0.381: U2.8@94.869,66.751 94.805,66.688 94.805,63.182 101.473,56.515 v1(109.474,56.515)
  Bottom Layer w0.381: v1(109.474,56.515) 109.474,58.801 111.177,60.504 117.4,60.504 118.364,61.468 118.364,65.532 117.72,66.176 117.642,66.176 116.889,66.929 P2.26@116.586,66.929
ENC_B2: P2.28 U2.12 | length 22.6
  Top Layer w0.381: U2.12@99.949,66.751 99.949,65.278 104.521,60.706 111.214,60.706 111.265,60.654 114.541,60.654 115.391,61.505 115.391,62.968 116.586,64.162 P2.28@116.586,64.389
ENCA0: ENC_0.3 U2.1 | length 46.4
  Top Layer w0.381: U2.1@102.489,71.933 102.489,72.517 103.188,73.215 120.587,73.215 124.587,77.216 124.587,85.979 125.984,87.376 ENC_0.3@137.033,87.376
ENCA1: ENC_1.3 U2.5 | length 41.3
  Top Layer w0.381: U2.5@97.409,71.933 97.409,71.097 98.275,70.231 109.728,70.231 110.161,70.664 126.002,70.664 126.689,69.977 ENC_1.3@137.033,69.977
ENCA2: ENC_2.3 U2.11 | length 44.9
  Top Layer w0.381: U2.11@98.679,66.751 98.679,64.77 105.335,58.114 119.94,58.114 122.174,55.88 128.143,55.88 130.302,53.721 ENC_2.3@137.033,53.721
ENCB0: ENC_0.2 U2.3 | length 51.3
  Top Layer w0.381: U2.3@99.949,71.933 99.949,74.604 100.973,75.629 110.272,75.629 110.399,75.755 121.475,75.755 123.571,77.851 123.571,86.741 125.222,88.392 130.048,88.392 131.572,89.916 ENC_0.2@137.033,89.916
ENCB1: ENC_1.2 U2.9 | length 46.2
  Top Layer w0.381: U2.9@96.139,66.751 96.139,67.587 96.878,68.326 109.474,68.326 110.363,67.437 v1(110.998,67.437)
  Bottom Layer w0.381: v1(110.998,67.437) 111.379,67.437 112.216,68.274 118.058,68.274 119.634,69.85 119.634,71.556 121.42,73.343 127.877,73.343 128.703,72.517 ENC_1.2@137.033,72.517
ENCB2: ENC_2.2 U2.13 | length 43.6
  Top Layer w0.381: U2.13@101.219,66.751 101.219,65.405 101.727,64.897 102.997,64.897 104.902,62.992 113.5,62.992 113.551,63.044 114.39,63.044 115.316,63.97 115.316,64.808 116.091,65.584 117.081,65.584 125.26,57.404 129.921,57.404 131.064,56.261 ENC_2.2@137.033,56.261